# Altium PCB ODOS_PCB_Payload_pcb.PcbDoc
Units mm, origin at the board's own origin, x right, y up, seen from the top; angles counter-clockwise.
Board outline 55.3 x 40.2 mm, 2 copper layers (Top Layer, Bottom Layer); 22 components, 18 nets, 58 pads, 0 vias.
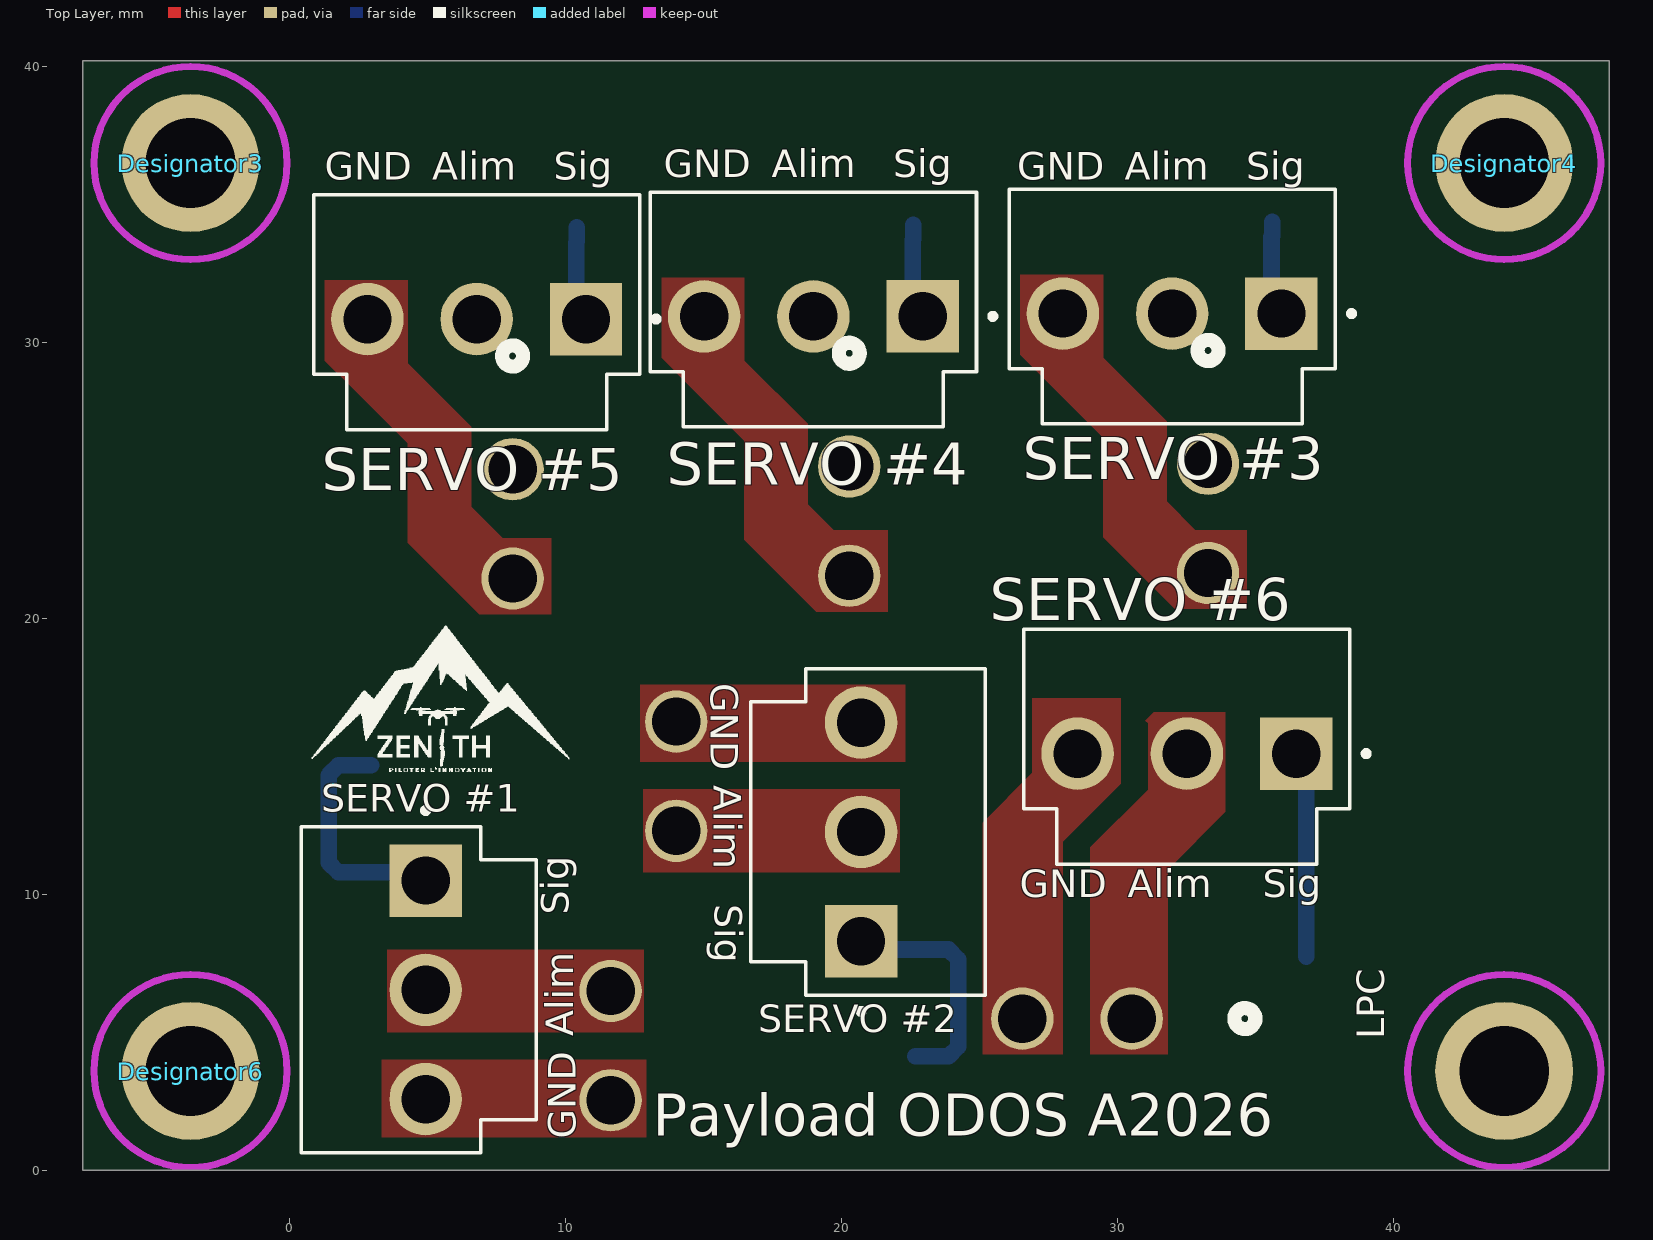
[diagram p0: Top Layer view]
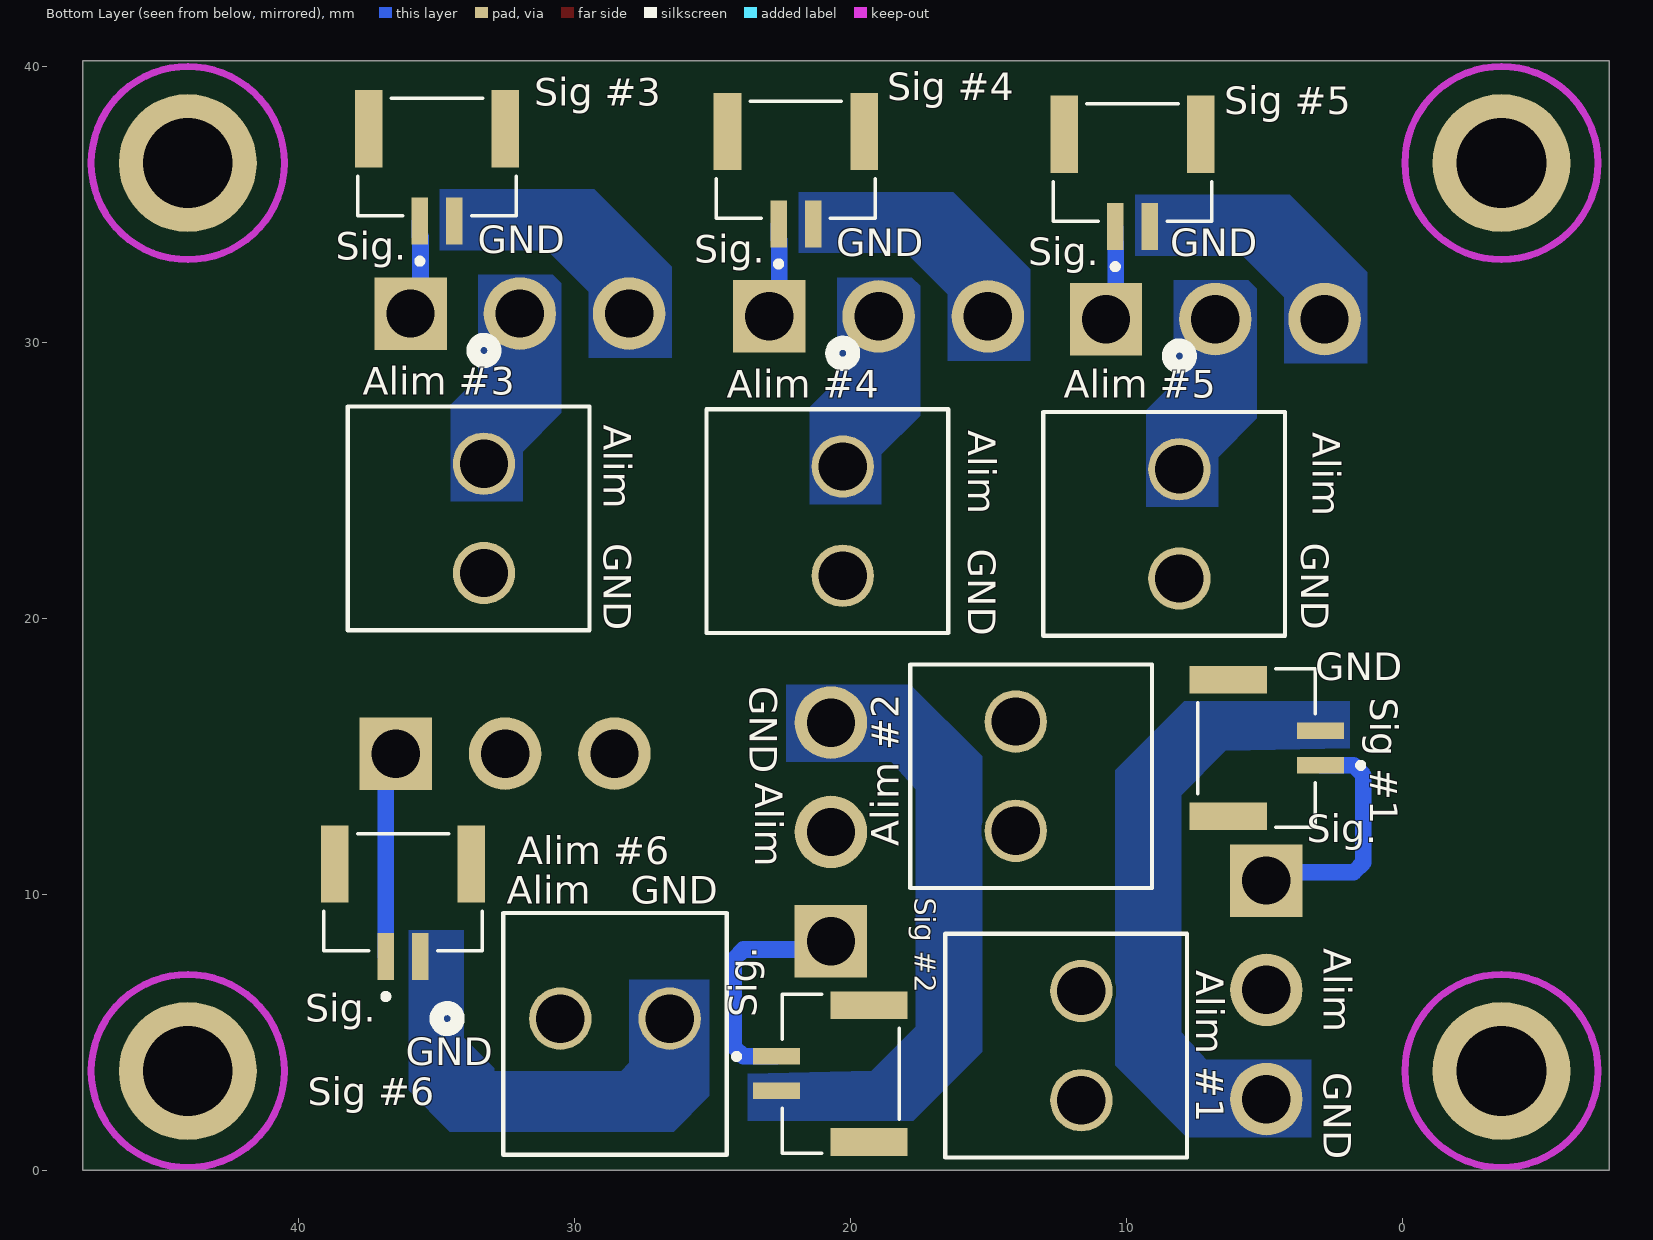
[diagram p1: Bottom Layer view, seen from below]
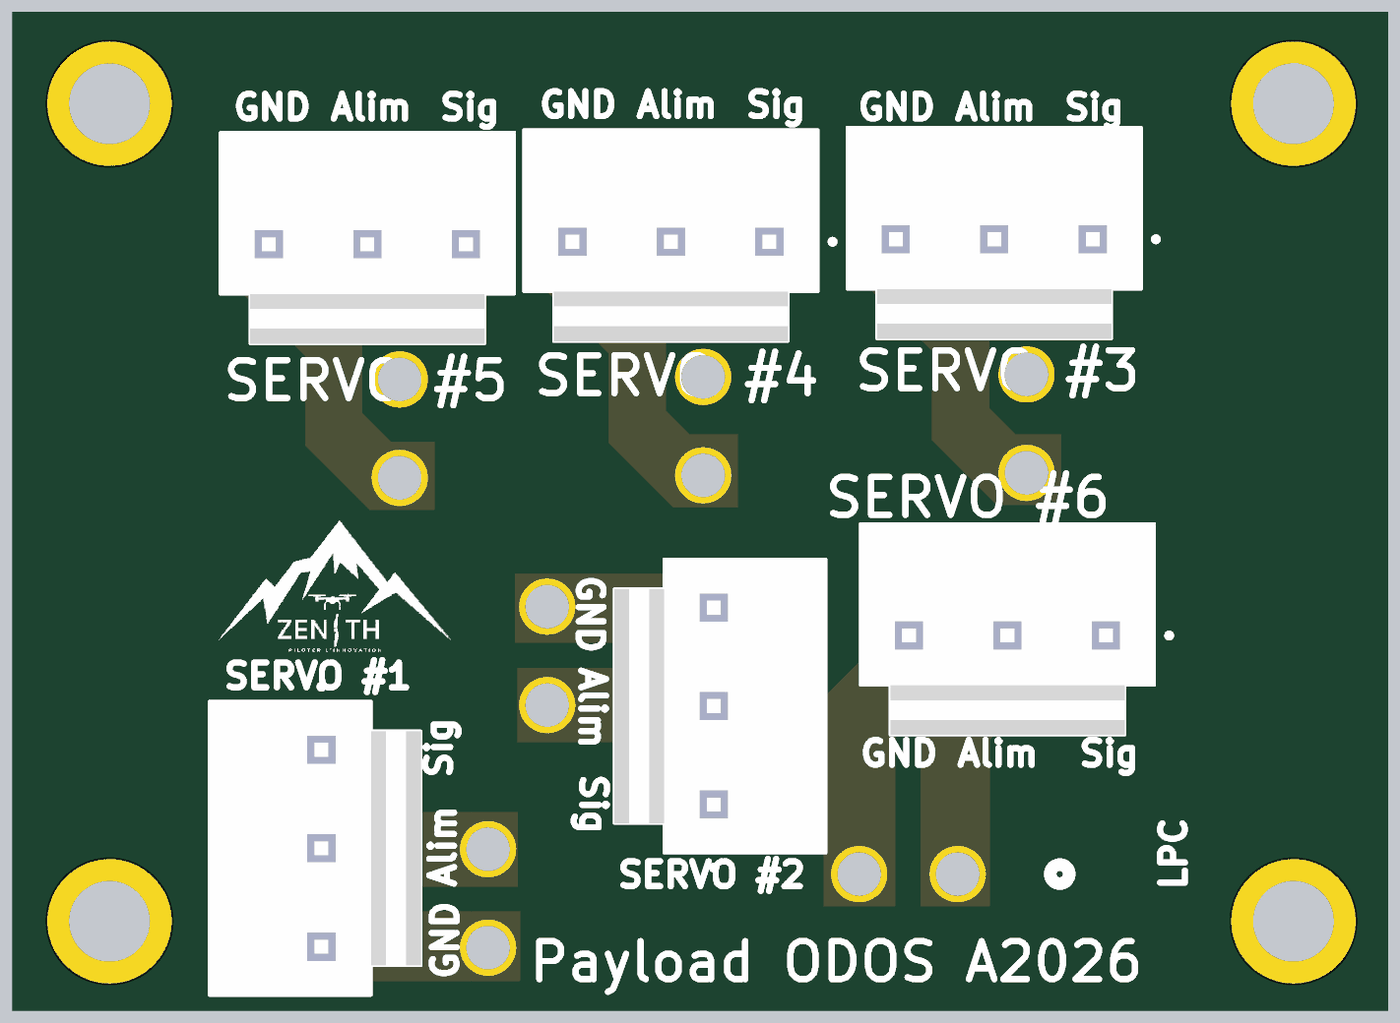
[diagram p2: 3D render of the assembled board from above, using the file's embedded part models]
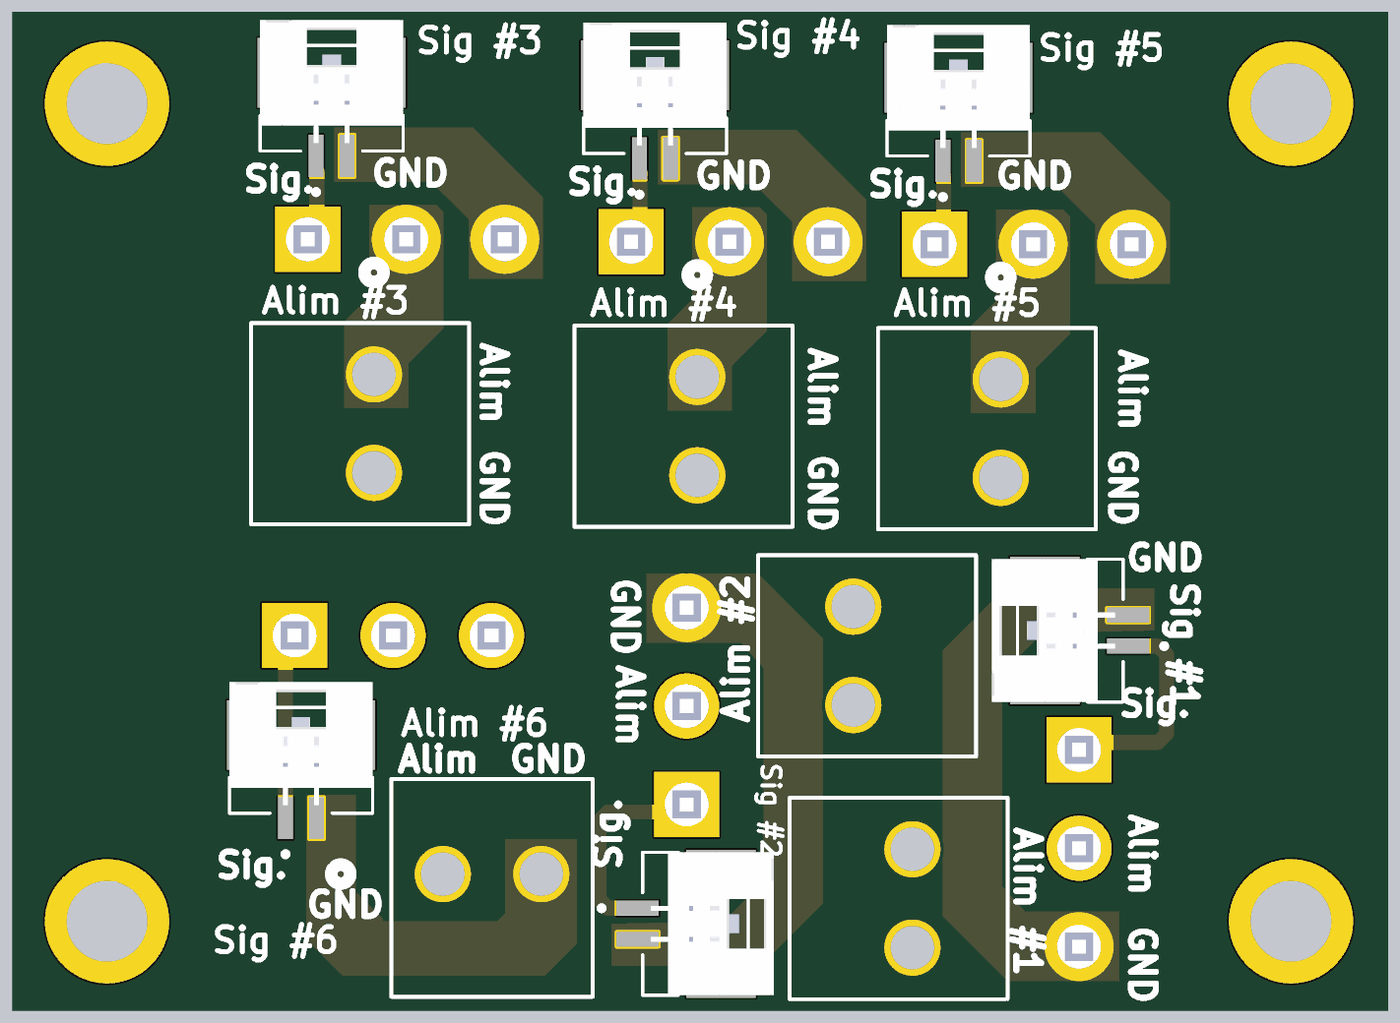
[diagram p3: 3D render of the assembled board from below, using the file's embedded part models]

## Layer stack, top to bottom
Top Solder: solder mask 0.0102, Solder Resist, Dk 3.5
Top Layer: signal copper 0.0356
Dielectric 1: dielectric 0.32, FR-4, Dk 4.8
Bottom Layer: signal copper 0.0356
Bottom Solder: solder mask 0.0102, Solder Resist, Dk 3.5

## Board outline
-7.5,0 -7.5,40.2 47.8,40.2 47.8,0

## Design rules (kind name [scope] priority, off if disabled: settings)
BoardOutlineClearance [All] p1: gap=0.2 ignorepadtopadclearanceinfootprint=FALSE
Clearance [All] p1: gap=0.127 ignorepadtopadclearanceinfootprint=FALSE except(0.25: Arc-Hole Track-Hole SMDPad-Hole THPad-Hole Via-Hole Fill-Hole Poly-Hole Region-Hole Text-Hole)
ComponentClearance [All] p1: gap=0.127 collisioncheckmode=3 verticalgap=0.127 showdistances=TRUE
DiffPairsRouting [All] p1: maxlimit=0.254 minlimit=0.127 mostfreqgap=0.127 toplayer_minwidth=0.127 toplayer_maxwidth=25.4 toplayer_prefwidth=0.127 bottomlayer_minwidth=0.127 bottomlayer_maxwidth=25.4 bottomlayer_prefwidth=0.127 maxuncoupledlength=12.7
Height [All] p1: minheight=0 maxheight=1816.048 prefheight=12.7
HoleSize [All] p1: absolutevalues=TRUE maxlimit=6.3 minlimit=0.3 maxpercent=80.000 minpercent=20.000
HoleToHoleClearance [All] p1: gap=0.25 allowstackedmicrovias=FALSE
MinimumAnnularRing [All] p1: minimumring=0.076
MinimumSolderMaskSliver [All] p1: minsoldermaskwidth=0
PlaneClearance [All] p1: clearance=0.127
PlaneConnect PlaneConnectPowerPads [InPadClass('PowerPads')] p1: planeconnectstyle=Direct reliefexpansion=0.508 reliefentries=4 reliefconductorwidth=0.254 reliefairgap=0.254
PlaneConnect [All] p2: pad.planeconnectstyle=Relief pad.reliefexpansion=0.3 pad.reliefentries=4 pad.reliefconductorwidth=0.127 pad.reliefairgap=0.127 via.planeconnectstyle=Direct via.reliefexpansion=0.3 via.reliefentries=4 via.reliefconductorwidth=0.127 via.reliefairgap=0.127
PolygonConnect PolygonConnectPowerPads [All vs (InPadClass('PowerPads'))] p1: connectstyle=Direct reliefconductorwidth=0.254 reliefentries=4 polygonreliefangle="90 Angle" airgapwidth=0.254
PolygonConnect [All] p2: connectstyle=Direct reliefconductorwidth=0.127 reliefentries=4 polygonreliefangle="90 Angle" airgapwidth=0.127
RoutingVias [All] p1: holewidth=0.3 width=0.6 viastyle="Through Hole" minholewidth=0.3 minwidth=0.6 maxholewidth=0.6 maxwidth=6.6
SilkToSilkClearance [All] p1: silktosilkclearance=0
SilkToSolderMaskClearance [IsPad] p1: minsilkscreentomaskgap=0.127 clearancetoexposedcopper=TRUE
SolderMaskExpansion [All] p1: expansion=0.075 istentingtop=FALSE
Width [All] p1: maxlimit=25.4 minlimit=0.127 preferedwidth=0.127 minimp=50.000000 maximp=50.000000 favimp=50.000000
20 further rules are at their usual default settings.

## Classes and differential pairs
component class ODOS_PCB_Payload_schem: "Alim #1" "Alim #2" "Alim #3" "Alim #4" "Alim #5" "Alim #6" "SERVO #1" "SERVO #2" "SERVO #3" "SERVO #4" "SERVO #5" "SERVO #6" "Sig #1" "Sig #2" "Sig #3" "Sig #4" "Sig #5" "Sig #6"

## Components (designator, comment, footprint, x,y, rotation, side; value= is the part's Value field where it differs from the comment)
"Alim #1" "JST B2P-VH" CONN_B2P-VH_JST 11.619,6.5 r270 bottom
"Alim #2" "JST B2P-VH" CONN_B2P-VH_JST 13.997,12.302 r90 bottom
"Alim #3" "JST B2P-VH" CONN_B2P-VH_JST 33.269,25.604 r270 bottom
"Alim #4" "JST B2P-VH" CONN_B2P-VH_JST 20.269,25.504 r270 bottom
"Alim #5" "JST B2P-VH" CONN_B2P-VH_JST 8.069,25.404 r270 bottom
"Alim #6" "JST B2P-VH" CONN_B2P-VH_JST 30.5,5.5 r180 bottom
Designator3 "Comment" "MH - Footprint" -3.6,36.5 r0 top
Designator4 "Comment" "MH - Footprint" 44,36.5 r0 top
Designator6 "Comment" "MH - Footprint" -3.6,3.6 r0 top
"SERVO #1" "JST B3P-VH" JST_B3P-VH(LF)(SN) 4.919,6.54 r270 top
"SERVO #2" "JST B3P-VH" JST_B3P-VH(LF)(SN) 20.697,12.262 r90 top
"SERVO #3" "JST B3P-VH" JST_B3P-VH(LF)(SN) 31.969,31.044 r180 top
"SERVO #4" "JST B3P-VH" JST_B3P-VH(LF)(SN) 18.969,30.944 r180 top
"SERVO #5" "JST B3P-VH" JST_B3P-VH(LF)(SN) 6.769,30.844 r180 top
"SERVO #6" "JST B3P-VH" JST_B3P-VH(LF)(SN) 32.5,15.1 r180 top
"Sig #1" "JST GH 2 pin" JST_BM02B-GHS-TBT(LF)(SN) 6.3,15.3 r270 bottom
"Sig #2" "JST GH 2 pin" JST_BM02B-GHS-TBT(LF)(SN) 19.317,3.502 r90 bottom
"Sig #3" "JST GH 2 pin" JST_BM02B-GHS-TBT(LF)(SN) 34.969,37.744 r0 bottom
"Sig #4" "JST GH 2 pin" JST_BM02B-GHS-TBT(LF)(SN) 21.969,37.644 r0 bottom
"Sig #5" "JST GH 2 pin" JST_BM02B-GHS-TBT(LF)(SN) 9.769,37.544 r0 bottom
"Sig #6" "JST GH 2 pin" JST_BM02B-GHS-TBT(LF)(SN) 36.2,11.1 r0 bottom
? "Comment" "MH - Footprint" 44,3.6 r0 top

## Footprints (in the part's own frame and the unit in brackets; to place one, negate y for a bottom-side part, rotate by r counter-clockwise, add the part's x,y. Pads: shape width x height; smd on the part's side, far side on the other; paste and mask are expansions set on the pad)
CONN_B2P-VH_JST [mil]
  round 89 / inner round 60 / far side round 89 hole 69 paste-99999 mask+0: 1(0,0) 2(155.91,0)
  silkscreen extent -82,-194 237,151
JST_B3P-VH(LF)(SN) [mm]
  rect 2.625x2.625 / inner round 2.625 / far side rect 2.625x2.625 hole 1.75: 1(-3.96,0)
  round 2.625 hole 1.75: 2(0,0) 3(3.96,0)
  silkscreen extent -6.6,-4.5 5.91,4, body extent -5.91,-4.5 5.91,4, height 10.9
JST_BM02B-GHS-TBT(LF)(SN) [mm]
  rect 0.6x1.7 smd: 1(0.625,3.35) 2(-0.625,3.35)
  rect 1x2.8 smd: P1(-2.475,0) P2(2.475,0)
  silkscreen extent -2.88,-1.1 2.88,4.9, body extent -2.88,-2.12 2.88,2.83, height 4.05
"MH - Footprint" [mm]
  round 5 hole 3.25: MH(0,0)
  Keep-Out Layer circle w0.254: c0,0 r3.5

## Part data
"Alim #1" "Alim #2" "Alim #3" "Alim #4" "Alim #5" "Alim #6": library part B2P-VHLFSN, "JST VH 2 pin", Manufacturer_Name=JST, Manufacturer_Part_Number=B2P-VH(LF)(SN), Copyright="Copyright (C) 2025 Ultra Librarian. All rights reserved.", RefDes=RefDes, Type=Type
"SERVO #1" "SERVO #2" "SERVO #3" "SERVO #4" "SERVO #5" "SERVO #6": library part B3P-VH(LF)(SN), "JST VH 3 PIN", Package=None, Check_prices=https://www.snapeda.com/parts/B3P-VH(LF)(SN)/JST/view-part/?ref=eda, MF="JST Sales", MP=B3P-VH(LF)(SN), SnapEDA_Link=https://www.snapeda.com/parts/B3P-VH(LF)(SN)/JST/view-part/?ref=snap
"Sig #1" "Sig #2" "Sig #3" "Sig #4" "Sig #5" "Sig #6": library part BM02B-GHS-TBT(LF)(SN), "Connector Header Surface Mount 2 position 0.049 (1.25mm)", Package=None, Check_prices=https://www.snapeda.com/parts/BM02B-GHS-TBT%20(LF)(SN)/JST/view-part/?ref=eda, MF="JST Sales", MP="BM02B-GHS-TBT (LF)(SN)", SnapEDA_Link=https://www.snapeda.com/parts/BM02B-GHS-TBT%20(LF)(SN)/JST/view-part/?ref=snap

## Nets (pads, with @x,y where several pads share a name; then routed paths per layer and width w, separated by ;. In a path a pad name is that pad's centre, name@x,y a point inside that pad or via, vN(x,y) a via of type N, cw(c..) or ccw(c..) an arc to the next point about the centre after c; other vN are vias at no path point)
"NetAlim #1_1": "Alim #1.1" "SERVO #1.2"
"NetAlim #1_2": "Alim #1.2" "SERVO #1.3" "Sig #1.2"
"NetAlim #2_1": "Alim #2.1" "SERVO #2.2"
"NetAlim #2_2": "Alim #2.2" "SERVO #2.3" "Sig #2.2"
"NetAlim #3_1": "Alim #3.1" "SERVO #3.2"
"NetAlim #3_2": "Alim #3.2" "SERVO #3.3" "Sig #3.2"
"NetAlim #4_1": "Alim #4.1" "SERVO #4.2"
"NetAlim #4_2": "Alim #4.2" "SERVO #4.3" "Sig #4.2"
"NetAlim #5_1": "Alim #5.1" "SERVO #5.2"
"NetAlim #5_2": "Alim #5.2" "SERVO #5.3" "Sig #5.2"
"NetAlim #6_1": "Alim #6.1" "SERVO #6.2"
"NetAlim #6_2": "Alim #6.2" "SERVO #6.3" "Sig #6.2"
"NetSERVO #1_1": "SERVO #1.1" "Sig #1.1" | length 8.8
  Top Layer w0.6: 5.019,10.5 5.019,10.6
  Bottom Layer w0.6: 2.95,14.675 1.751,14.675 1.4,14.324 1.4,11.151 1.751,10.8 4.619,10.8 4.919,10.5
"NetSERVO #2_1": "SERVO #2.1" "Sig #2.1" | length 8.8
  Top Layer w0.6: 20.597,8.202 20.597,8.302
  Bottom Layer w0.6: 20.697,8.302 20.997,8.002 23.865,8.002 24.217,7.65 24.217,4.478 23.865,4.127 22.667,4.127
"NetSERVO #3_1": "SERVO #3.1" "Sig #3.1" | length 2.5
  Bottom Layer w0.6: 35.569,31.844 35.569,33.819 35.594,33.844 35.594,34.369
"NetSERVO #4_1": "SERVO #4.1" "Sig #4.1" | length 2.5
  Bottom Layer w0.6: 22.569,31.744 22.569,33.719 22.594,33.744 22.594,34.269
"NetSERVO #5_1": "SERVO #5.1" "Sig #5.1" | length 2.5
  Bottom Layer w0.6: 10.369,31.644 10.369,33.619 10.394,33.644 10.394,34.169
"NetSERVO #6_1": "SERVO #6.1" "Sig #6.1" | length 6.6
  Bottom Layer w0.6: 36.825,7.75 36.825,14.087 36.938,14.2 37,14.2
pads on no net: "Sig #1.P1" "Sig #1.P2" "Sig #2.P1" "Sig #2.P2" "Sig #3.P1" "Sig #3.P2" "Sig #4.P1" "Sig #4.P2" "Sig #5.P1" "Sig #5.P2" "Sig #6.P1" "Sig #6.P2" ?.MH Designator3.MH Designator4.MH Designator6.MH

## Polygon pours and split planes (outlines as drawn)
"NetAlim #6_2" on Top Layer "NETALIM_#6_2_L01_P033" (solid, pour order 33): 28,4.2 28,11.9 30.1,14 30.1,17.1 26.9,17.1 26.9,14.4 25.1,12.6 25.1,4.2
"NetAlim #6_1" on Top Layer "NETALIM_#6_1_L01_P032" (solid, pour order 32): 31.8,4.2 31.8,10.9 33.9,13 33.9,16.6 31.3,16.6 31,16.3 31.1,16.2 31.1,13.8 29,11.7 29,4.2
"NetAlim #2_2" on Top Layer "NETALIM_#2_2_L01_P030" (solid, pour order 30): 22.297,14.802 12.697,14.802 12.697,17.602 22.297,17.602
"NetAlim #2_1" on Top Layer "NETALIM_#2_1_L01_P029" (solid, pour order 29): 12.797,13.802 12.797,10.802 22.097,10.802 22.097,13.802
"NetAlim #5_2" on Top Layer "NETALIM_#5_2_L01_P027" (solid, pour order 27): 9.469,20.144 6.869,20.144 4.269,22.744 4.269,26.344 2.369,28.244 1.269,29.344 1.269,32.244 4.269,32.244 4.269,29.244 6.569,26.944 6.569,24.044 7.713,22.9 9.469,22.9
"NetAlim #4_2" on Top Layer "NETALIM_#4_2_L01_P024" (solid, pour order 24): 21.669,20.244 19.069,20.244 16.469,22.844 16.469,26.444 14.569,28.344 13.469,29.444 13.469,32.344 16.469,32.344 16.469,29.344 18.769,27.044 18.769,24.144 19.713,23.2 21.669,23.2
"NetAlim #3_2" on Top Layer "NETALIM_#3_2_L01_P021" (solid, pour order 21): 34.669,20.344 32.069,20.344 29.469,22.944 29.469,26.544 27.569,28.444 26.469,29.544 26.469,32.444 29.469,32.444 29.469,29.444 31.769,27.144 31.769,24.244 32.813,23.2 34.669,23.2
"NetAlim #1_1" on Top Layer "NETALIM_#1_1_L01_P003" (solid, pour order 3): 12.819,5 12.819,8 3.519,8 3.519,5
"NetAlim #1_2" on Top Layer "NETALIM_#1_2_L01_P004" (solid, pour order 4): 3.319,4 12.919,4 12.919,1.2 3.319,1.2
"NetAlim #6_2" on Bottom Layer "NETALIM_#6_2_L02_P034" (solid, pour order 34): 36,8.7 36,2.9 34.5,1.4 26.4,1.4 25.1,2.7 25.1,6.9 28,6.9 28,3.9 28.3,3.6 32.9,3.6 32.9,3.7 34,4.8 34,8.7
"NetAlim #2_2" on Bottom Layer "NETALIM_#2_2_L02_P031" (solid, pour order 31): 23.717,3.502 23.717,1.802 17.717,1.802 15.217,4.302 15.217,15.002 17.817,17.602 22.317,17.602 22.317,14.802 18.517,14.802 17.617,13.802 17.617,13.702 17.617,5.202 19.217,3.602
"NetAlim #1_2" on Bottom Layer "NETALIM_#1_2_L02_P028" (solid, pour order 28): 1.9,15.3 1.9,17 7.9,17 10.4,14.5 10.4,3.8 7.8,1.2 3.3,1.2 3.3,4 7.1,4 8,5 8,5.1 8,13.6 6.4,15.2
"NetAlim #5_1" on Bottom Layer "NETALIM_#5_1_L02_P026" (solid, pour order 26): 9.269,24.044 6.669,24.044 6.669,25.844 5.269,27.244 5.269,31.944 5.569,32.244 8.269,32.244 8.269,28.544 9.269,27.544 9.269,27.444
"NetAlim #5_2" on Bottom Layer "NETALIM_#5_2_L02_P025" (solid, pour order 25): 4.069,35.344 1.269,32.544 1.269,29.244 4.269,29.244 4.269,31.644 5.769,33.144 9.669,33.144 9.669,35.344
"NetAlim #4_2" on Bottom Layer "NETALIM_#4_2_L02_P022" (solid, pour order 22): 16.269,35.444 13.469,32.644 13.469,29.344 16.469,29.344 16.469,31.744 17.969,33.244 21.869,33.244 21.869,35.444
"NetAlim #4_1" on Bottom Layer "NETALIM_#4_1_L02_P023" (solid, pour order 23): 21.469,24.144 18.869,24.144 18.869,25.944 17.469,27.344 17.469,32.044 17.769,32.344 20.469,32.344 20.469,28.644 21.469,27.644 21.469,27.544
"NetAlim #3_2" on Bottom Layer "NETALIM_#3_2_L02_P019" (solid, pour order 19): 29.269,35.544 26.469,32.744 26.469,29.444 29.469,29.444 29.469,31.844 30.969,33.344 34.869,33.344 34.869,35.544
"NetAlim #3_1" on Bottom Layer "NETALIM_#3_1_L02_P020" (solid, pour order 20): 34.469,24.244 31.869,24.244 31.869,26.044 30.469,27.444 30.469,32.144 30.769,32.444 33.469,32.444 33.469,28.744 34.469,27.744 34.469,27.644

## Silkscreen, mask and mechanical layers (free items; w line width, h text height)
Top Overlay:
  drawing of 27 lines, arcs and shapes, not listed
  text "GND" at 13.554,35.987 h1
  text "Alim" at 17.454,35.987 h1
  text "Sig" at 21.854,35.987 h1
  text "GND" at 1.254,35.887 h1
  text "Alim" at 5.154,35.887 h1
  text "Sig" at 9.554,35.887 h1
  text "GND" at 26.354,35.887 h1
  text "Alim" at 30.254,35.887 h1
  text "Sig" at 34.654,35.887 h1
  text "GND" at 15.251,17.648 h1 r270
  text "Alim" at 15.351,13.948 h1 r270
  text "GND" at 26.454,9.887 h1
  text "Alim" at 30.354,9.887 h1
  text "Sig" at 35.254,9.887 h1
  text "Sig" at 15.387,9.646 h1 r270
  text "Sig" at 10.113,9.254 h1 r90
  text "Alim" at 10.265,4.854 h1 r90
  text "LPC" at 39.646,4.754 h1 r90
  text "Payload ODOS A2026" at 13.154,1.262 h1.52
  text "GND" at 10.365,1.154 h1 r90
Bottom Overlay:
  text "GND" at 33.495,33.23 h1
  text "GND" at 8.395,33.13 h1
  text "GND" at 20.495,33.13 h1
  text "Sig." at 38.646,32.987 h1
  text "Sig." at 25.646,32.887 h1
  text "Sig." at 13.546,32.787 h1
  text "Alim" at 28.921,27.016 h1 r90
  text "Alim" at 15.721,26.816 h1 r90
  text "Alim" at 3.246,26.746 h1 r90
  text "GND" at 3.646,22.746 h1 r90
  text "GND" at 28.921,22.716 h1 r90
  text "GND" at 15.721,22.516 h1 r90
  text "GND" at 3.146,17.754 h1
  text "GND" at 23.646,17.546 h1 r90
  text "Alim" at 23.446,14.046 h1 r90
  text "Sig." at 3.446,11.887 h1
  text "GND" at 27.946,9.654 h1
  text "Alim" at 32.446,9.654 h1
  text "Alim" at 2.846,8.046 h1 r90
  text "Sig." at 23.387,5.554 h1 r270
  text "Sig." at 39.746,5.387 h1
  text "GND" at 36.105,3.802 h1
  text "GND" at 2.846,3.546 h1 r90